# Altium PCB ePBR20_ACU_Power_rev0.PcbDoc (part 3 of 3)
Units mil, origin at the board's own origin, x right, y up, seen from the top; angles counter-clockwise.
Board outline 7475 x 3770 mil, 2 copper layers (Top Layer, Bottom Layer); 143 components, 136 nets, 557 pads, 1444 vias.
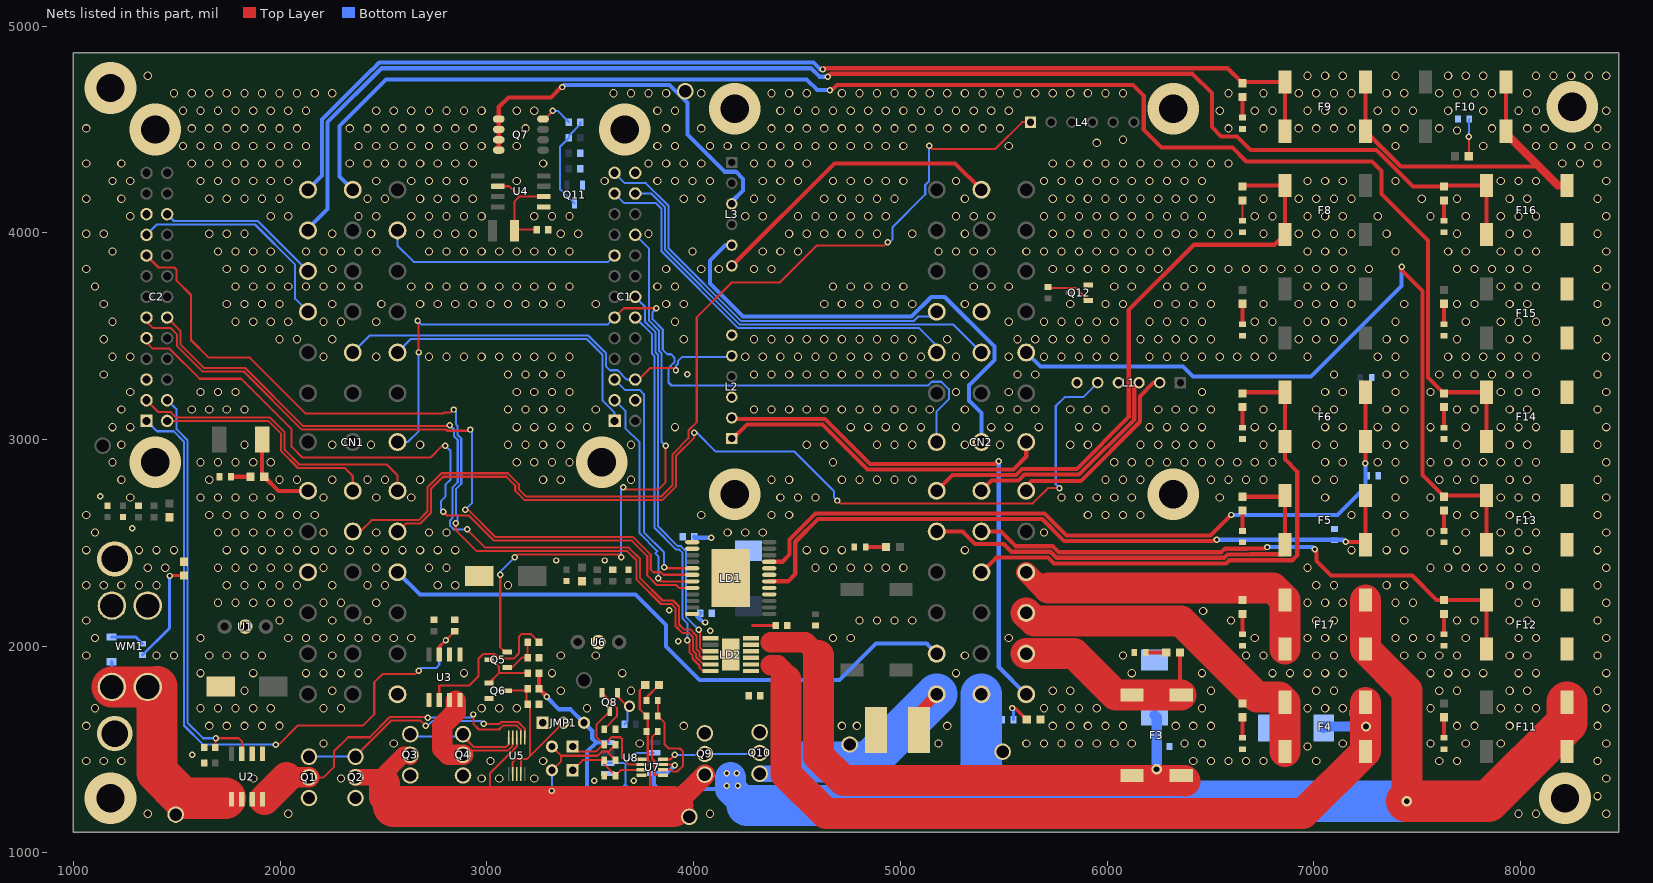
[diagram p2: the nets of this part, all layers, seen from the top]

## Via types
v1: diameter 40, hole 30, Top Layer to Bottom Layer, 1281 vias
v2: diameter 31, hole 17, Top Layer to Bottom Layer, 142 vias
v3: diameter 250, hole 137, Top Layer to Bottom Layer, 12 vias
v4: diameter 50, hole 28, Top Layer to Bottom Layer, 5 vias
v5: diameter 170, hole 128, Top Layer to Bottom Layer, 2 vias
v6: diameter 55, hole 35, Top Layer to Bottom Layer, 1 vias
v7: diameter 100, hole 75, Top Layer to Bottom Layer, 1 vias

## Nets (pads, with @x,y where several pads share a name; then routed paths per layer and width w, separated by ;. In a path a pad name is that pad's centre, name@x,y a point inside that pad or via, vN(x,y) a via of type N, cw(c..) or ccw(c..) an arc to the next point about the centre after c; other vN are vias at no path point) (continued)
DCDC_CURR_SENS: C2.A1 C8.2 U3.7 | length 3395.1
  Top Layer w10: v2@1992.83,1524.01 2084.62,1615.79 2400.72,1615.79 2455.5,1670.58 2455.5,1825.15 2495.35,1865 2653.74,1865 v2(2670,1881.26) ; v2(2802.56,2030) C8.2@2845,2072.44
  Top Layer w15: v2(1980,1524.01) v2@1992.83,1524.01 ; U3.7@2770,1960.24 2770,1997.44 v2(2802.56,2030)
  Bottom Layer w10: C2.A1@1355,3090 1405,3040 1485,3040 1535.5,2989.5 1535.5,1616.5 1627.99,1524.01 v2(1980,1524.01) ; v2(2670,1881.26) 2683.74,1895 2755,1895 2770,1910 2770,1997.44 v2(2802.56,2030)
DCDC_EN: JMP1.2 Q6.3 R4.2 R7.1 U5.2 U5.4 | length 881.8
  Top Layer w10: Q6.3@3099.29,1785 3182.44,1785 3192.44,1795 R4.2@3192.44,1720 ; U5.2@3125.3,1382 3125.3,1439.76 3140.54,1455 3164.7,1455 ; U5.4@3164.7,1382 3164.7,1455 ; R4.2@3197.44,1720 3210,1707.44 3210,1470 ; JMP1.2@3370,1630 3210,1470 ; 3164.7,1455 3195,1455 3210,1470
DCDC_EN_INT: C1.B10 Q5.2 | length 2864.4
  Top Layer w10: v2(3065,2345) 3065,1995 3087.6,1972.4 Q5.2@3099.29,1972.4 ; v2(3135,2430) 3148,2443 3642,2443 v2@3655,2430 ; v2(3660,2770) 3672.29,2757.71 3828.51,2757.71 3865,2794.2 v2(3865,2970)
  Bottom Layer w10: v2(3065,2345) 3065,2360 v2(3135,2430) ; v2(3650,2430) 3650,2760 v2(3660,2770) ; C1.B10@3718.02,3990 3785,3923.02 3785,3574.04 3834,3525.04 3834,3428.12 3845.13,3416.99 3845.13,2989.87 v2(3865,2970)
DCDC_PWR: CN1.39 R6.1 U3.1 U3.2 | length 787.6
  Top Layer w10: U3.2@2770,1739.76 2770,1810 2915,1810 2960,1855 2960,1940 2981.81,1961.81 3039.56,1961.81 3061.37,1940 3130,1940 3155,1965 3155,2045 3170,2060 3212.56,2060 R6.1@3252.56,2020
DCDC_TO_PWR_SW: Q4.2 U3.3 U3.4 U5.9 | length 677.1
  Top Layer w10: Q4.2@2885,1465 2915,1495 3101.25,1495 3125.3,1519.05 U5.9@3125.3,1558
  Top Layer w50: Q4.2@2878.93,1465 Q4.2@2885,1465
  Top Layer w100: 2850,1735 2850,1681.59 2785,1616.59 2785,1505 2815,1475 Q4.2@2885,1475
DELAYED_UV: JMP3.1 Q8.3 R11.2 U7.2 | length 688.7
  Top Layer w10: JMP3.1@3415,1515 3439.53,1490.47 3527.91,1490.47 3561.45,1524.01 R11.2@3567.44,1524.01 ; Q8.3@3595,1685.71 3530,1620.71 3530,1561.45 R11.2@3567.44,1524.01 ; U7.2@3751.14,1430.51 U7.2@3748.43,1427.8 3687.2,1427.8 3655,1460 3655,1551.45 3646.45,1560 3603.43,1560 R11.2@3567.44,1524.01
EMETER_PWR: CN1.4 D20.1 F16.2 | length 6861.8
  Top Layer w20: v2@4649.69,4754.69 v2(4650,4755) 4664,4769 6414.18,4769 6507,4676.18 6507,4511.18 6552.18,4466 6629,4466 6695,4400 7302.8,4400 7479.34,4223.46 D20.1@7630,4223.46 7635.43,4228.9 F16.2@7835.12,4228.9 F16.2@7835.12,3991.1
  Bottom Layer w20: CN1.4@2135,4011.62 2135,4020 2230,4115 2230,4535 2491,4796 4569,4796 4610,4755 v2(4650,4755)
EXTRA_INPUT1: C1.A1 CN1.15 | length 1394.3
  Bottom Layer w10: CN1.15@2568.07,3421.07 2633,3486 3483.92,3486 3558.9,3411.02 3558.9,3189.55 3618.02,3130.44 C1.A1@3618.02,3090
EXTRA_INPUT2: C2.A10 CN1.10 | length 1073.6
  Bottom Layer w10: C2.A10@1354.02,3990 1404.02,4040 1878.66,4040 2072.92,3845.74 2072.92,3680 CN1.10@2135,3617.92
F\A\U\L\T\2\: R16.1 R18.2 U7.6 | length 514.3
  Top Layer w10: R16.1@3827.56,1738 R18.2@3827.56,1663 3827.56,1662.44 3860,1630 3860,1525 3879.5,1505.5 3934.5,1505.5 3950,1490 3950,1421.87 3922.63,1394.5 3897.37,1394.5 3886.95,1404.92 3854.29,1404.92 U7.6@3851.57,1402.2
FANS_CTRL: C1.B7 LD2.3 | length 1927.7
  Top Layer w10: v2(4025,2080) 4031.5,2073.5 4031.5,1992.71 4048.46,1975.75 LD2.3@4082.56,1975.75 4081.81,1975 LD2.3@4049.21,1975
  Bottom Layer w10: C1.B7@3718.02,3690 3765,3643.02 3765,3570 3817,3518 3817,3421.08 3828.13,3409.95 3828.13,3144.39 3828,3144.25 3828,3135.75 3828.13,3135.61 3828.13,2579.95 3923.58,2484.5 3938.43,2484.5 3964.5,2458.43 3964.5,2140.5 v2(4025,2080)
FANS_FB: C2.B6 LD2.4 | length 3820.7
  Top Layer w10: C2.B6@1454.02,3590 1518,3526.02 1518,3460.08 1633.08,3345 1832.88,3345 2112.88,3065 2113.18,3065.31 2815.31,3065.31 v2(2820,3070) ; v2@2905,2564 2992,2477 3687.04,2477 3742,2422.04 3742,2366.97 3741.91,2366.87 3741.91,2329.17 3849.82,2221.26 3900.95,2221.26 3929.88,2192.33 3929.88,2105.12 3953,2082 3983.56,2082 4014.5,2051.06 4014.5,1985.67 4029,1971.17 4029,1955.04 4039.79,1944.25 LD2.4@4082.56,1944.25
  Bottom Layer w10: v2(2820,3070) 2841.5,3048.5 2841.5,3015.79 2859.5,2997.79 2859.5,2792.58 2833.5,2766.58 2833.5,2619.53 2822.5,2608.53 2822.5,2582.5 2840,2565 v2(2905,2565)
FANS_FUSE: D23.2 F3.1 LD2.10 LD2.11 R38.1 | length 2831
  Top Layer w100: 4375,2020 4540,2020 4605,1955
  Top Layer w150: 4605,1955 4605,1470 4724.8,1350.2 5910,1350.2 5910,1350 6375,1350 F3.1@6377.8,1347.2
  Bottom Layer w50: D23.2@6230,1666.14 6240,1656.14 v4(6240,1405)
FANS_PWR: CN2.4 D8.1 F3.2 | length 1039.8
  Top Layer w10: F3.2@6353.46,1770.31 F3.2@6358.9,1764.88
  Top Layer w20: F3.2@6353.46,1770.31 D8.1@6353.46,1970
  Top Layer w150: CN2.4@5609.06,1964.38 5840.62,1964.38 6040.12,1764.88 F3.2@6121.1,1764.88 F3.2@6358.9,1764.88
GATE: Q9.1 Q10.1 U7.8 | length 481.1
  Top Layer w10: U7.8@3851.57,1453.39 3888.39,1453.39 v2(3910,1475) ; Q10.1@4315.05,1478.98 Q10.1@4320,1483.92
  Bottom Layer w10: v2(3910,1475) 4051.02,1475 Q9.1@4055,1478.98 Q10.1@4315.05,1478.98
GND: C1.1 C1.B2 C1.B13 C2.1 C2.A3 C2.A11 C4.1 C5.1 C6.2 C7.1 C8.1 C9.2 C11.1 C13.1 C14.1 C15.1 C16.2 C17.1 C18.1 CN1.28 CN2.29 D1.2 D2.1 D4.2 D7.2 D22.1 D23.1 D24.1 JMP1.1 L1.4 L1.6 L2.3 L2.6 LD1.2 LD2.1 Q6.2 Q11.2 Q12.2 R1.1 R3.2 R4.1 R5.1 R9.1 R12.1 R14.2 R15.1 R19.1 R20.2 R21.2 R22.2 R23.2 R24.2 R25.2 R26.2 R27.2 R28.2 R29.2 R30.2 R31.2 R32.2 R33.2 R34.2 R35.2 R36.2 R37.1 R38.2 R39.2 R42.2 R44.1 R45.1 R48.2 U1.2 U2.5 U2.6 U3.5 U3.6 U4.1 U5.3 U6.2 U7.4 U8.1 WM1.2
  other v1: 1360,1190 2040,1190 4080,1190 7990,1190 8075,1190 8415,1190 8372.5,1275 1870,1360 2295,1360 2975,1360 3060,1360 3230,1360 8415,1360 1062.5,1445 1147.5,1445 1232.5,1445 3017.5,1445 3272.5,1445 6417.5,1445 6502.5,1445 6587.5,1445 6672.5,1445 6757.5,1445 7012.5,1445 7607.5,1445 7692.5,1445 8372.5,1445 6970,1515 2210,1530 2550,1530 3740,1530 5185,1530 5610,1530 5695,1530 5780,1530 5865,1530 5950,1530 6035,1530 6120,1530 6375,1530 6460,1530 7140,1530 7565,1530 7735,1530 7905,1530 8415,1530 1062.5,1615 1657.5,1615 1742.5,1615 1827.5,1615 1912.5,1615 1997.5,1615 3952.5,1615 4717.5,1615 4790,1615 5227.5,1615 5737.5,1615 5822.5,1615 5907.5,1615 5992.5,1615 6077.5,1615 6332.5,1615 6417.5,1615 6502.5,1615 7692.5,1615 7777.5,1615 7947.5,1615 8372.5,1615 1105,1700 1615,1700 1700,1700 1785,1700 1870,1700 1955,1700 2210,1700 2295,1700 2975,1700 3060,1700 3145,1700 3485,1700 5695,1700 5780,1700 5865,1700 5950,1700 6460,1700 6970,1700 7055,1700 7140,1700 7565,1700 7905,1700 7990,1700 8075,1700 8415,1700 1827.5,1785 2252.5,1785 3357.5,1785 3697.5,1785 5737.5,1785 5822.5,1785 6502.5,1785 7012.5,1785 7097.5,1785 7607.5,1785 7692.5,1785 7947.5,1785 8032.5,1785 8372.5,1785 1615,1870 1870,1870 2125,1870 2210,1870 2295,1870 2380,1870 2890,1870 3315,1870 3655,1870 5270,1870 6120,1870 6460,1870 6800,1870 6885,1870 6970,1870 7055,1870 7140,1870 7565,1870 7650,1870 7735,1870 7820,1870 7990,1870 8075,1870 8415,1870 1062.5,1955 1402.5,1955 1487.5,1955 1657.5,1955 1742.5,1955 1827.5,1955 1912.5,1955 2252.5,1955 3357.5,1955 3527.5,1955 5312.5,1955 6077.5,1955 6672.5,1955 6757.5,1955 7012.5,1955 7097.5,1955 7437.5,1955 7522.5,1955 7607.5,1955 7692.5,1955 7947.5,1955 8032.5,1955 8372.5,1955 1105,2040 1615,2040 2040,2040 2125,2040 2210,2040 2295,2040 2380,2040 2465,2040 2550,2040 2635,2040 4675,2040 4760,2040 5525,2040 6715,2040 6970,2040 7055,2040 7140,2040 7395,2040 7480,2040 7565,2040 7735,2040 7990,2040 8075,2040 8415,2040 1062.5,2125 1997.5,2125 2252.5,2125 2422.5,2125 4802.5,2125 4887.5,2125 4972.5,2125 5057.5,2125 6600,2125 7012.5,2125 7097.5,2125 7437.5,2125 7692.5,2125 7777.5,2125 7947.5,2125 8032.5,2125 8372.5,2125 6465,2170 1700,2210 1785,2210 1870,2210 1955,2210 2040,2210 2210,2210 2295,2210 2465,2210 6970,2210 7055,2210 7140,2210 7395,2210 7480,2210 7990,2210 8075,2210 8415,2210 1062.5,2295 1147.5,2295 1232.5,2295 1317.5,2295 1402.5,2295 1742.5,2295 1827.5,2295 1912.5,2295 1997.5,2295 2082.5,2295 2252.5,2295 2422.5,2295 2507.5,2295 2762.5,2295 2847.5,2295 3102.5,2295 7012.5,2295 7097.5,2295 7352.5,2295 7437.5,2295 7947.5,2295 8032.5,2295 8372.5,2295 1360,2380 1445,2380 1700,2380 1785,2380 1870,2380 1955,2380 2040,2380 2210,2380 2465,2380 2720,2380 2805,2380 4590,2380 4675,2380 4760,2380 4845,2380 4930,2380 5015,2380 6970,2380 7565,2380 7650,2380 7735,2380 7820,2380 7905,2380 7990,2380 8075,2380 8415,2380 1062.5,2465 1317.5,2465 1402.5,2465 1487.5,2465 1742.5,2465 1827.5,2465 1912.5,2465 1997.5,2465 2082.5,2465 2167.5,2465 2252.5,2465 2337.5,2465 2422.5,2465 2507.5,2465 2592.5,2465 2677.5,2465 2762.5,2465 2847.5,2465 4547.5,2465 4632.5,2465 4717.5,2465 5312.5,2465 7182.5,2465 7352.5,2465 7437.5,2465 7692.5,2465 7947.5,2465 8032.5,2465 8372.5,2465 1105,2550 1700,2550 1785,2550 1870,2550 1955,2550 2040,2550 2210,2550 2465,2550 2720,2550 2805,2550 4165,2550 4250,2550 4335,2550 5695,2550 7395,2550 7565,2550 7735,2550 7905,2550 7990,2550 8075,2550 8415,2550 1062.5,2635 1657.5,2635 1742.5,2635 1827.5,2635 1912.5,2635 1997.5,2635 2082.5,2635 2167.5,2635 4037.5,2635 4377.5,2635 4462.5,2635 5907.5,2635 5992.5,2635 6077.5,2635 6162.5,2635 7182.5,2635 7352.5,2635 7437.5,2635 7692.5,2635 7777.5,2635 7947.5,2635 8032.5,2635 8372.5,2635 1275,2720 1615,2720 1700,2720 1785,2720 1870,2720 1955,2720 2210,2720 2465,2720 2635,2720 4420,2720 4505,2720 4590,2720 5780,2720 5865,2720 5950,2720 6035,2720 6120,2720 6545,2720 7055,2720 7395,2720 7565,2720 7905,2720 7990,2720 8075,2720 8415,2720 1232.5,2805 1657.5,2805 1997.5,2805 2082.5,2805 2252.5,2805 2422.5,2805 2507.5,2805 2677.5,2805 3272.5,2805 3357.5,2805 3697.5,2805 4377.5,2805 4462.5,2805 4717.5,2805 4802.5,2805 4887.5,2805 4972.5,2805 5057.5,2805 5992.5,2805 6077.5,2805 6162.5,2805 6502.5,2805 6587.5,2805 6672.5,2805 6757.5,2805 7012.5,2805 7097.5,2805 7437.5,2805 7607.5,2805 7692.5,2805 7777.5,2805 7947.5,2805 8032.5,2805 8372.5,2805 1190,2890 1615,2890 1700,2890 1785,2890 1870,2890 1955,2890 3145,2890 3230,2890 3315,2890 3400,2890 4675,2890 6035,2890 6120,2890 6205,2890 6290,2890 6375,2890 6460,2890 6545,2890 6630,2890 6715,2890 6800,2890 7055,2890 7140,2890 7310,2890 7395,2890 7565,2890 7650,2890 7735,2890 7820,2890 7905,2890 7990,2890 8075,2890 8415,2890 1232.5,2975 1827.5,2975 2252.5,2975 2440,2975 2677.5,2975 3102.5,2975 3187.5,2975 3272.5,2975 3357.5,2975 3697.5,2975 4547.5,2975 4632.5,2975 4887.5,2975 4972.5,2975 5057.5,2975 5312.5,2975 5482.5,2975 5822.5,2975 5907.5,2975 6162.5,2975 6247.5,2975 6332.5,2975 6417.5,2975 6502.5,2975 6757.5,2975 7012.5,2975 7097.5,2975 7352.5,2975 7437.5,2975 7692.5,2975 7947.5,2975 8032.5,2975 8372.5,2975 1190,3060 1275,3060 3145,3060 3230,3060 3315,3060 3400,3060 3485,3060 3910,3060 4760,3060 4845,3060 4930,3060 5015,3060 5100,3060 5270,3060 5440,3060 5525,3060 5670,3060 5865,3060 5950,3060 6205,3060 6290,3060 6375,3060 6460,3060 6715,3060 6800,3060 7055,3060 7140,3060 7310,3060 7395,3060 7565,3060 7735,3060 7905,3060 7990,3060 8075,3060 8415,3060 1232.5,3145 1572.5,3145 1657.5,3145 1742.5,3145 1827.5,3145 3102.5,3145 3187.5,3145 3272.5,3145 3357.5,3145 3527.5,3145 4292.5,3145 4377.5,3145 4462.5,3145 4547.5,3145 4632.5,3145 4717.5,3145 4802.5,3145 4887.5,3145 4972.5,3145 5057.5,3145 5142.5,3145 5312.5,3145 5482.5,3145 5567.5,3145 5652.5,3145 5822.5,3145 5907.5,3145 5992.5,3145 6247.5,3145 6332.5,3145 6417.5,3145 6502.5,3145 6757.5,3145 7012.5,3145 7097.5,3145 7352.5,3145 7437.5,3145 7692.5,3145 7777.5,3145 7947.5,3145 8032.5,3145 8372.5,3145 1275,3230 1615,3230 1700,3230 1785,3230 3145,3230 3230,3230 3315,3230 3400,3230 5270,3230 5525,3230 6460,3230 7055,3230 7140,3230 7395,3230 7565,3230 7905,3230 7990,3230 8075,3230 8415,3230 1147.5,3315 3102.5,3315 3187.5,3315 3272.5,3315 3357.5,3315 4292.5,3315 4377.5,3315 4462.5,3315 4547.5,3315 4632.5,3315 4717.5,3315 4802.5,3315 4887.5,3315 4972.5,3315 5057.5,3315 5142.5,3315 5227.5,3315 5312.5,3315 5567.5,3315 5652.5,3315 7097.5,3315 7352.5,3315 7437.5,3315 7607.5,3315 7692.5,3315 7777.5,3315 7862.5,3315 7947.5,3315 8032.5,3315 8372.5,3315 1190,3400 1275,3400 2210,3400 2465,3400 2720,3400 2805,3400 2890,3400 2975,3400 3060,3400 3145,3400 3230,3400 3315,3400 3400,3400 4250,3400 4335,3400 4420,3400 4505,3400 4590,3400 4675,3400 4760,3400 4845,3400 4930,3400 5015,3400 5100,3400 5270,3400 5525,3400 5695,3400 5780,3400 5865,3400 5950,3400 6035,3400 6205,3400 6290,3400 6375,3400 6460,3400 6545,3400 6630,3400 6715,3400 6800,3400 6970,3400 7310,3400 7395,3400 7650,3400 7735,3400 7820,3400 7905,3400 7990,3400 8075,3400 8415,3400 1147.5,3485 1997.5,3485 2082.5,3485 2252.5,3485 3952.5,3485 4292.5,3485 4377.5,3485 4462.5,3485 4547.5,3485 4632.5,3485 4717.5,3485 4802.5,3485 4887.5,3485 4972.5,3485 5057.5,3485 5227.5,3485 5567.5,3485 5652.5,3485 5737.5,3485 5822.5,3485 5907.5,3485 5992.5,3485 6162.5,3485 6247.5,3485 6332.5,3485 6417.5,3485 6502.5,3485 6757.5,3485 6927.5,3485 7012.5,3485 7097.5,3485 7352.5,3485 7437.5,3485 7692.5,3485 7947.5,3485 8032.5,3485 8372.5,3485 1190,3570 1785,3570 1870,3570 1955,3570 2040,3570 2210,3570 2295,3570 2465,3570 3910,3570 5525,3570 5695,3570 5780,3570 5865,3570 5950,3570 6035,3570 6205,3570 6290,3570 6375,3570 6460,3570 6715,3570 6800,3570 6970,3570 7055,3570 7140,3570 7395,3570 7735,3570 7905,3570 7990,3570 8075,3570 8415,3570 1147.5,3655 1742.5,3655 1827.5,3655 1912.5,3655 1997.5,3655 2252.5,3655 2490,3655 2677.5,3655 2762.5,3655 2847.5,3655 2932.5,3655 3017.5,3655 3102.5,3655 3187.5,3655 3272.5,3655 3357.5,3655 3527.5,3655 3867.5,3655 3952.5,3655 4632.5,3655 4717.5,3655 4802.5,3655 4887.5,3655 4972.5,3655 5057.5,3655 5312.5,3655 5822.5,3655 5992.5,3655 6077.5,3655 6247.5,3655 6332.5,3655 6417.5,3655 6502.5,3655 6757.5,3655 6927.5,3655 7012.5,3655 7097.5,3655 7182.5,3655 7437.5,3655 7692.5,3655 7777.5,3655 7947.5,3655 8032.5,3655 8372.5,3655 1105,3740 1785,3740 1870,3740 1955,3740 2040,3740 2125,3740 2210,3740 2295,3740 2380,3740 2635,3740 2720,3740 2805,3740 2890,3740 2975,3740 3060,3740 3145,3740 3230,3740 3315,3740 3400,3740 3825,3740 3910,3740 4675,3740 4760,3740 4845,3740 4930,3740 5015,3740 5355,3740 5440,3740 5525,3740 6035,3740 6120,3740 6290,3740 6375,3740 6460,3740 6970,3740 7055,3740 7140,3740 7905,3740 7990,3740 8075,3740 8415,3740 1062.5,3825 1742.5,3825 1827.5,3825 1912.5,3825 1997.5,3825 2252.5,3825 3867.5,3825 4037.5,3825 4122.5,3825 4292.5,3825 4377.5,3825 5737.5,3825 5822.5,3825 5907.5,3825 5992.5,3825 6077.5,3825 6162.5,3825 6247.5,3825 6417.5,3825 6502.5,3825 6587.5,3825 6672.5,3825 6757.5,3825 6842.5,3825 6927.5,3825 7012.5,3825 7097.5,3825 7182.5,3825 7267.5,3825 7692.5,3825 7777.5,3825 7862.5,3825 7947.5,3825 8032.5,3825 8372.5,3825 1190,3910 1700,3910 1785,3910 1870,3910 1955,3910 2125,3910 2210,3910 2295,3910 2380,3910 2465,3910 2720,3910 2805,3910 2890,3910 2975,3910 3060,3910 3145,3910 3230,3910 3315,3910 3400,3910 3995,3910 4335,3910 4420,3910 4505,3910 5185,3910 5270,3910 5355,3910 5440,3910 5610,3910 5695,3910 5780,3910 5865,3910 5950,3910 6035,3910 6120,3910 6205,3910 6290,3910 6970,3910 7055,3910 7140,3910 7395,3910 7650,3910 7735,3910 7905,3910 7990,3910 8075,3910 8415,3910 1062.5,3995 1147.5,3995 1657.5,3995 1742.5,3995 1827.5,3995 2252.5,3995 2440.5,3995 2677.5,3995 2762.5,3995 2847.5,3995 2932.5,3995 3357.5,3995 3442.5,3995 3782.5,3995 4462.5,3995 4547.5,3995 4632.5,3995 4717.5,3995 4802.5,3995 4887.5,3995 5057.5,3995 5312.5,3995 5737.5,3995 5822.5,3995 5907.5,3995 5992.5,3995 6077.5,3995 6162.5,3995 6247.5,3995 6332.5,3995 6417.5,3995 6502.5,3995 6587.5,3995 6757.5,3995 6927.5,3995 7012.5,3995 7097.5,3995 7182.5,3995 7352.5,3995 7692.5,3995 7947.5,3995 8032.5,3995 8372.5,3995 1275,4080 1955,4080 2040,4080 2380,4080 2465,4080 2635,4080 2720,4080 2805,4080 2890,4080 2975,4080 3230,4080 3315,4080 3400,4080 4250,4080 4335,4080 4505,4080 4590,4080 4675,4080 4760,4080 4845,4080 4930,4080 5270,4080 5355,4080 5440,4080 5695,4080 5780,4080 5865,4080 5950,4080 6035,4080 6120,4080 6205,4080 6290,4080 6375,4080 6460,4080 6715,4080 6800,4080 6970,4080 7055,4080 7140,4080 7310,4080 7565,4080 7735,4080 7905,4080 7990,4080 8075,4080 8415,4080 1062.5,4165 1232.5,4165 1657.5,4165 1742.5,4165 1827.5,4165 1912.5,4165 1997.5,4165 2422.5,4165 2507.5,4165 2677.5,4165 2762.5,4165 2847.5,4165 2932.5,4165 3952.5,4165 4037.5,4165 4292.5,4165 4377.5,4165 4632.5,4165 4717.5,4165 4802.5,4165 4887.5,4165 4972.5,4165 5312.5,4165 5737.5,4165 5822.5,4165 5907.5,4165 5992.5,4165 6077.5,4165 6162.5,4165 6247.5,4165 6332.5,4165 6417.5,4165 6502.5,4165 6757.5,4165 6927.5,4165 7012.5,4165 7097.5,4165 7182.5,4165 7522.5,4165 7692.5,4165 7947.5,4165 8032.5,4165 8372.5,4165 1190,4250 1275,4250 1615,4250 1700,4250 1785,4250 1870,4250 1955,4250 2040,4250 2465,4250 2635,4250 2720,4250 2805,4250 2890,4250 3145,4250 3570,4250 3825,4250 3910,4250 3995,4250 4080,4250 4335,4250 4420,4250 4505,4250 4675,4250 4760,4250 4845,4250 4930,4250 5015,4250 5270,4250 5695,4250 5780,4250 5865,4250 5950,4250 6035,4250 6120,4250 6205,4250 6290,4250 6375,4250 6460,4250 6970,4250 7055,4250 7140,4250 7395,4250 7905,4250 7990,4250 8075,4250 8415,4250 1062.5,4335 1232.5,4335 1572.5,4335 1657.5,4335 1742.5,4335 1827.5,4335 1912.5,4335 1997.5,4335 2082.5,4335 2337.5,4335 2422.5,4335 2507.5,4335 2592.5,4335 2677.5,4335 2762.5,4335 2847.5,4335 2932.5,4335 3272.5,4335 3782.5,4335 3867.5,4335 3952.5,4335 4037.5,4335 4292.5,4335 4377.5,4335 4462.5,4335 4547.5,4335 5737.5,4335 5822.5,4335 5907.5,4335 5992.5,4335 6077.5,4335 6162.5,4335 6247.5,4335 6332.5,4335 6417.5,4335 6502.5,4335 6587.5,4335 8202.5,4335 8287.5,4335 8372.5,4335 1530,4420 1615,4420 1700,4420 1785,4420 1870,4420 1955,4420 2040,4420 2125,4420 2380,4420 2465,4420 2550,4420 2635,4420 2720,4420 2805,4420 2890,4420 2975,4420 3145,4420 3825,4420 3910,4420 4080,4420 4165,4420 4250,4420 4335,4420 4420,4420 4505,4420 4590,4420 4675,4420 4760,4420 4845,4420 4930,4420 5015,4420 5525,4420 7395,4420 7820,4420 8075,4420 8160,4420 8245,4420 8330,4420 8415,4420 5950,4435 6077.5,4450 7692.5,4495 1062.5,4505 1572.5,4505 1657.5,4505 1742.5,4505 1827.5,4505 1912.5,4505 1997.5,4505 2082.5,4505 2337.5,4505 2422.5,4505 2507.5,4505 2592.5,4505 2677.5,4505 2762.5,4505 2847.5,4505 2932.5,4505 3187.5,4505 3867.5,4505 4037.5,4505 4377.5,4505 4462.5,4505 4547.5,4505 4632.5,4505 4717.5,4505 4802.5,4505 4887.5,4505 4972.5,4505 5057.5,4505 5142.5,4505 5227.5,4505 5312.5,4505 5397.5,4505 5482.5,4505 6587.5,4505 6757.5,4505 6927.5,4505 7012.5,4505 7097.5,4505 7182.5,4505 7352.5,4505 7437.5,4505 7607.5,4505 7862.5,4505 8032.5,4505 8117.5,4505 8372.5,4505 1530,4590 1615,4590 1700,4590 1785,4590 1870,4590 1955,4590 2040,4590 2125,4590 2465,4590 2550,4590 2635,4590 2720,4590 2805,4590 2890,4590 2975,4590 3145,4590 3230,4590 3825,4590 3910,4590 4420,4590 4505,4590 4590,4590 4675,4590 4760,4590 4845,4590 4930,4590 5015,4590 5100,4590 5185,4590 5270,4590 5355,4590 5440,4590 5525,4590 6545,4590 6715,4590 6800,4590 6970,4590 7055,4590 7140,4590 7310,4590 7395,4590 7480,4590 7650,4590 7820,4590 7990,4590 8075,4590 8415,4590 1487.5,4675 1572.5,4675 1657.5,4675 1742.5,4675 1827.5,4675 1912.5,4675 1997.5,4675 2082.5,4675 2167.5,4675 2252.5,4675 3612.5,4675 3697.5,4675 3782.5,4675 3867.5,4675 4037.5,4675 4377.5,4675 4462.5,4675 4547.5,4675 4717.5,4675 4802.5,4675 4887.5,4675 4972.5,4675 5057.5,4675 5142.5,4675 5227.5,4675 5312.5,4675 5397.5,4675 5482.5,4675 5567.5,4675 5652.5,4675 5737.5,4675 5822.5,4675 5907.5,4675 5992.5,4675 6077.5,4675 6587.5,4675 6757.5,4675 6927.5,4675 7012.5,4675 7097.5,4675 7182.5,4675 7352.5,4675 7437.5,4675 7607.5,4675 7692.5,4675 7777.5,4675 7862.5,4675 8032.5,4675 1360,4760 6970,4760 7055,4760 7140,4760 7395,4760 7650,4760 7735,4760 7820,4760 8075,4760 8160,4760 8245,4760 8330,4760 8415,4760
  other v2: 3520,1350 3710,1350 1575,1475 3927,2025 4080,2075 3882,2175 3335,2415 3570.87,2415 1285,2570 1130,2725 3970,3315
  other v3: 1180,1265 8215,1265 4200,2735 6320,2735 1396,2890 3556,2890 1396,4500 3668,4500 4200,4600 6320,4600 8250,4610 1180,4700
  other v5: 1200.55,1577.56 1200.55,2422.44
GREEN_LED_GND: CN2.17 L1.3 | length 1070
  Top Layer w20: CN2.17@5392.52,2751.78 5441.74,2801 5571,2801 5600,2830 5865,2830 6132,3097 6132,3252 L1.3@6155,3275
HCP_H_CURR_SENS: C2.B1 CN1.23 | length 1129.4
  Top Layer w10: C2.B1@1454.02,3090 1943.63,3090 2005,3028.63 2005,2943.62 2086.62,2862 2313,2862 2351.54,2823.46 CN1.23@2351.54,2751.78
HCP_L_CURR_SENS: C2.A2 CN1.24 | length 1489.4
  Top Layer w10: C2.A2@1354.02,3190 1411.9,3132.12 1471.46,3132.12 1496.58,3107 1950.67,3107 2022,3035.67 2022,2950.66 2093.66,2879 2516,2879 2568.07,2826.93 CN1.24@2568.07,2751.78
HCP_SENS_PWR: CN1.22 D3.1 F1.2 | length 424.1
  Top Layer w20: F1.2@1912.95,3000 1912.95,2830.51 D3.1@1923.46,2820 1991.69,2751.78 CN1.22@2135,2751.78
HVB_PWR: CN1.2 D18.1 F14.2 | length 7415
  Top Layer w20: v2(4660,4690) 4665.5,4695.5 4674.65,4695.5 4694.15,4715 6125,4715 6178,4662 6178,4497 6263,4412 6606.63,4412 6673.63,4345 7281.43,4345 7327.43,4299 7327.43,4187.57 7553,3962 7553,3300.46 D18.1@7630,3223.46 7635.43,3228.9 F14.2@7835.12,3228.9 F14.2@7835.12,2991.1
  Bottom Layer w20: CN1.2@2351.54,4208.47 2287,4273.01 2287,4515.63 2513.37,4742 4546.63,4742 4598.63,4690 v2(4660,4690)
IMD_LED: CN2.38 L3.6 | length 1465.8
  Top Layer w20: L3.6@4185,3840 4681,4336 5264.99,4336 CN2.38@5392.52,4208.47
IMD_OK: C1.B3 CN1.14 L2.5 | length 2084.7
  Top Layer w10: C1.B3@3718.02,3290 3723.02,3285 3736.02,3298 3739.02,3295 3789.26,3345.24 3904.76,3345.24 v2(3915,3335)
  Bottom Layer w10: CN1.14@2351.54,3421.07 2433.46,3503 3490.96,3503 3565.96,3428 3567,3428 3575.9,3419.1 3575.9,3354.1 3595,3335 3632.58,3335 3677.58,3290 C1.B3@3718.02,3290 ; v2@3915,3325.23 v2(3915,3335) 3915,3357.07 3924.5,3366.57 3924.5,3379.5 3945,3400 L2.5@4185,3400
IMD_PWR: CN1.1 D14.1 F9.2 | length 5425
  Top Layer w20: v2(4625,4790) 4631,4796 6582.46,4796 D14.1@6655,4723.46 6660.43,4728.9 F9.2@6860.12,4728.9 F9.2@6860.12,4491.1
  Bottom Layer w20: CN1.1@2135,4208.47 2203,4276.47 2203,4548 2445,4790 2446.82,4790 2479.82,4823 4580.18,4823 4613.18,4790 v2(4625,4790)
IMD_RESIST: C2.B11 CN1.7 | length 795
  Bottom Layer w10: C2.B11@1454.02,4090 1487.02,4057 1892.77,4057 CN1.7@2135,3814.77
LATCH_RST: CN2.1 L2.2 | length 2569.5
  Top Layer w20: L2.2@4185,3100 4635,3100 4853,2882 5458.44,2882 5471.44,2895 v2(5476.44,2895)
  Bottom Layer w20: v2(5476.44,2895) 5476.44,1900.14 CN2.1@5609.06,1767.53
LATCHING_Delayed: L3.3 pad.9@3960,4685 Q7.5 Q7.6 Q7.7 Q7.8 | length 1872.1
  Top Layer w20: Q7.8@3041.82,4400 Q7.8@3057.72,4400 Q7.7@3057.72,4450 Q7.6@3057.72,4500 Q7.5@3057.72,4550 3057.72,4607.72 3105,4655 3310,4655 3360,4705 v2(3365,4705)
  Bottom Layer w20: v2(3365,4705) 3365,4706.53 3373.47,4715 3883.96,4715 3970,4628.96 3970,4475.92 4150.44,4295.48 4204.52,4295.48 4240,4260 4240,4205 4185,4150 L3.3@4185,4140
LVBATT_CURR_SENS: C2.B2 C5.2 U2.7 | length 2005.6
  Top Layer w10: C5.2@1687.56,1510 v2@1687.56,1552.56 ; v2(1690,1555) 1800,1555 1815,1540 U2.7@1815,1480.24
  Top Layer w15: v2@1687.56,1552.56 v2(1690,1555)
  Bottom Layer w10: C2.B2@1455,3190 1500,3145 1500,3049.04 1552.5,2996.54 1552.5,1630.61 1628.11,1555 v2(1690,1555)
MC_EN: CN2.11 D11.1 F6.2 | length 2631.1
  Top Layer w20: CN2.11@5392.52,2382.52 CN2.11@5392.52,2358.08 5464.44,2430 5715,2430 5744,2401 6576.51,2401 6591.51,2416 6896.26,2416 6920,2439.74 6920,2845 6860.12,2904.88 F6.2@6860.12,2991.1 F6.2@6860.12,3228.9 6660.43,3228.9 D11.1@6655,3223.46
MC_EN_CTRL: C1.A3 LD1.5 | length 1188.4
  Top Layer w10: v2(3857.5,2381.24) 3861.5,2377.24 LD1.5@3993.98,2377.24
  Bottom Layer w10: C1.A3@3618.02,3290 3668,3240.02 3739.98,3240.02 3760.13,3219.87 3760.13,3172.55 3760,3172.42 3760,3107.58 3760.13,3107.45 3760.13,2550.82 3857.5,2453.46 v2(3857.5,2381.24)
MC_EN_FB: C2.A6 LD1.6 | length 3525.1
  Top Layer w10: C2.A6@1354.02,3590 1354.02,3570.98 1385,3540 1470,3540 1501,3509 1501,3453.04 1626.04,3328 1825.83,3328 2105.83,3048 2119.92,3048 2120.22,3048.31 2802.8,3048.31 2808.61,3042.5 2914.19,3042.5 v2(2920,3048.31) ; v2(2895,2660) 2910.08,2660 3042.08,2528 3708.17,2528 3793,2443.17 3793,2370.65 3805.58,2358.08 3841.77,2358.08 3854.1,2345.75 LD1.6@3993.98,2345.75
  Bottom Layer w10: v2(2895,2660) 2927.5,2692.5 2927.5,3040.81 v2(2920,3048.31) v2@2920,3039
MC_EN_FUSE: F6.1 LD1.19 LD1.20 LD1.21 R35.1 | length 3623
  Top Layer w20: LD1.21@4366.02,2408.74 4429.72,2408.74 4464.49,2443.51 4464.49,2516.31 4590.42,2642.24 5697.95,2642.24 5804.18,2536 6501,2536 v2(6600,2635) ; F6.1@7249.88,2991.1 F6.1@7249.88,3228.9 ; v2(7250,2885) F6.1@7250,2990.98
  Bottom Layer w20: v2(6600,2635) 7115,2635 7250,2770 v2(7250,2885)
MC_PWR: CN2.15 D10.1 F5.2 | length 2229
  Top Layer w20: CN2.15@5175.98,2554.93 5301.99,2554.93 5362.3,2494.62 5500.38,2494.62 5538,2457 5726.18,2457 5755.18,2428 6565.33,2428 6581.99,2444.66 6690.94,2444.66 6691.28,2445 6849.76,2445 6860.12,2455.35 F5.2@6860.12,2491.1 F5.2@6860.12,2728.9 6854.69,2723.46 D10.1@6655,2723.46
MC_PWR_CTRL: C1.A2 LD1.7 | length 1127.3
  Top Layer w10: v2(3830,2328.05) 3843.8,2314.25 LD1.7@3993.98,2314.25
  Bottom Layer w10: C1.A2@3619,3190 3670,3139 3670,3055 3739,2986 3739,2546 3825,2460 3815,2450 3830,2435 v2(3830,2328.05)
MC_PWR_FB: C2.A5 LD1.8 | length 3552
  Top Layer w10: C2.A5@1360,3490 C2.A5@1354.02,3490 1354.02,3470.98 1385,3440 1465,3440 1611,3294 1811.75,3294 2056,3049.75 2056,2964.74 2107.74,2913 2728,2913 2785,2970 v2(2800,2970) ; v2(2790,2650) 2807.5,2632.5 2913.54,2632.5 3035.04,2511 3701.12,2511 3776,2436.12 3776,2352.88 3775.91,2352.79 3775.91,2343.25 3822.67,2296.49 3916.14,2296.49 3929.88,2282.76 LD1.8@3993.98,2282.76
  Bottom Layer w10: v2(2800,2970) 2825.5,2944.5 2825.5,2806.67 2799.5,2780.67 2799.5,2723.39 2777.5,2701.39 2777.5,2662.5 v2(2790,2650) v2@2800.24,2650
MC_PWR_FUSE: F5.1 LD1.16 LD1.17 LD1.18 R39.1 | length 3374.9
  Top Layer w20: LD1.18@4366.02,2314.25 4456.17,2314.25 4492,2350.08 4492,2505.63 4601.6,2615.24 5686.76,2615.24 5793,2509 6512.18,2509 6519.09,2515.91 6529.09,2515.91 v2(6530,2515) ; v2(7155,2505) 7249.88,2505 F5.1@7249.88,2728.9
  Bottom Layer w20: v2(6530,2515) 7145,2515 v2(7155,2505)
NetC10_2: C10.2 R9.2 U4.2 U4.6 | length 529.7
  Top Layer w10: U4.6@3053.78,4225 3107.76,4225 3157.76,4175 ; R9.2@3242.44,4015 3138.15,4015 C10.2@3133.15,4010 3133.15,4150.39 3157.76,4175 ; U4.2@3276.22,4175 3157.76,4175
NetD2_2: D2.2 R47.1 | length 505.2
  Top Layer w15: v2(1466.81,2340) 1468.35,2341.53 D2.2@1535,2341.53
  Bottom Layer w15: R47.1@1335,1957.44 1465,2087.44 v2@1465,2340
NetD3_2: D3.2 R3.1 | length 96.4
  Top Layer w20: R3.1@1765,2820 R3.1@1762.56,2820 D3.2@1856.53,2820
NetD5_2: D5.2 R16.2 | length 100.3
  Top Layer w10: R16.2@3772.44,1738 3772.44,1751.98 D5.2@3833.47,1813
NetD6_2: D6.2 R20.1 | length 99
  Top Layer w20: R20.1@4832.56,2480 D6.2@4931.53,2480
NetD7_1: D7.1 R40.2 | length 139.3
  Top Layer w15: v2(5541.75,1701.3) 5544.81,1698.24 5558.3,1698.24 D7.1@5611.54,1645
  Bottom Layer w15: R40.2@5547.56,1645 v2@5547.56,1691.16
NetD8_2: D8.2 R21.1 | length 99
  Top Layer w20: R21.1@6187.56,1970 D8.2@6286.53,1970
NetD9_2: D9.2 R22.1 | length 99
  Top Layer w20: R22.1@6655,1557.56 D9.2@6655,1656.53
NetD10_2: D10.2 R23.1 | length 99
  Top Layer w20: R23.1@6655,2557.56 D10.2@6655,2656.53
NetD11_2: D11.2 R24.1 | length 99
  Top Layer w20: R24.1@6655,3057.56 D11.2@6655,3156.53
NetD12_2: D12.2 R25.1 | length 99
  Top Layer w20: R25.1@6655,3557.56 D12.2@6655,3656.53
NetD13_2: D13.2 R26.1 | length 99
  Top Layer w10: R26.1@6655,4057.56 D13.2@6655,4156.53
NetD14_2: D14.2 R27.1 | length 99
  Top Layer w20: R27.1@6655,4557.56 D14.2@6655,4656.53
NetD15_2: D15.2 R28.1 | length 99
  Top Layer w20: R28.1@7630,1557.56 D15.2@7630,1656.53
NetD16_2: D16.2 R29.1 | length 99
  Top Layer w20: R29.1@7630,2057.56 D16.2@7630,2156.53
NetD17_2: D17.2 R30.1 | length 99
  Top Layer w20: R30.1@7630,2557.56 D17.2@7630,2656.53
NetD18_2: D18.2 R31.1 | length 99
  Top Layer w20: R31.1@7630,3057.56 D18.2@7630,3156.53
NetD19_2: D19.2 R32.1 | length 99
  Top Layer w20: R32.1@7630,3557.56 D19.2@7630,3656.53
NetD20_2: D20.2 R33.1 | length 99
  Top Layer w20: R33.1@7630,4057.56 D20.2@7630,4156.53
NetD21_2: D21.2 R34.1 | length 181.1
  Top Layer w10: D21.2@7750,4370 v2(7750,4465)
  Bottom Layer w10: v2(7750,4465) 7750,4547.44 R34.1@7752.56,4550
NetD25_A: D25.A R47.2 | length 163.4
  Bottom Layer w15: D25.A@1185,2045 1302.56,2045 R47.2@1335,2012.56
NetD26_2: D26.2 R48.1 | length 99
  Top Layer w20: R48.1@6655,2057.56 D26.2@6655,2156.53
NetQ1_1: Q1.1 Q2.1 U5.6 | length 1223.8
  Top Layer w10: Q2.1@2365,1465.95 2365,1467.24 2538.98,1641.22 2678.78,1641.22 v2(2705,1615) v2@2710,1610 ; v2(2985,1625) 3062.25,1625 3070.68,1633.43 3152.27,1633.43 3183.94,1601.75 U5.6@3183.94,1558
  Bottom Layer w10: Q1.1@2140,1465.95 Q2.1@2365,1465.95 ; v2(2705,1615) 2705,1606.11 2736.89,1638 2972,1638 v2(2985,1625) v2@2984.5,1624.5
NetQ1_3: Q1.3 Q2.3 | length 0
NetQ3_1: Q3.1 Q4.1 U5.10 | length 535.5
  Top Layer w10: Q4.1@2885,1565 2938,1512 3091.1,1512 3105.6,1526.5 U5.10@3105.6,1558
  Bottom Layer w10: Q3.1@2630,1565 2630.5,1564.5 2884.5,1564.5 Q4.1@2885,1565
NetQ3_3: Q3.3 Q4.3
NetQ5_1: Q5.1 R5.2 R6.2 | length 192.8
  Top Layer w10: Q5.1@3099.29,1897.6 3122.6,1897.6 3170,1945 R5.2@3197.44,1945 R6.2@3197.44,2020
NetQ5_3: Q5.3 Q6.1 R8.1 | length 299.5
  Top Layer w10: Q6.1@3010.71,1822.4 3058.31,1870 ; Q5.3@3010.71,1935 3025,1935 3058.31,1901.69 3058.31,1870 ; R8.1@3197.44,1870 3058.31,1870
NetQ7_4: Q7.4 R46.2 | length 164.5
  Top Layer w10: Q7.4@3272.28,4550 3280,4550 v2(3320,4590)
  Bottom Layer w10: v2(3320,4590) 3342.44,4590 R46.2@3397.44,4535
NetQ8_2: Q8.2 R14.1 | length 230.7
  Top Layer w10: Q8.2@3557.6,1774.29 3567.44,1764.45 3611.54,1720.35 3611.78,1720.35 3618.81,1713.32 3618.81,1713.08 3629.29,1702.6 3629.29,1660.86 R14.1@3567.44,1599.01
NetQ11_3: Q11.3 R43.1 R46.1 | length 463.8
  Bottom Layer w10: Q11.3@3425,4140.71 3424.76,4140.71 3355,4210.47 3355,4417.56 R43.1@3397.44,4460 3397.44,4468.98 3452.56,4524.09 R46.1@3452.56,4535
NetQ12_1: Q12.1 R49.2 | length 227.7
  Top Layer w10: R49.2@5715,3737.56 5718.75,3733.81 5848.32,3733.81 5891.65,3690.47 5891.65,3679.41 5898.46,3672.6 Q12.1@5909.29,3672.6
NRST: C1.B12 CN2.26 | length 2113.2
  Bottom Layer w10: C1.B12@3718.02,4190 3795,4190 3862.13,4122.87 3862.13,3917.71 4223.85,3556 5257.59,3556 CN2.26@5392.52,3421.07
OV: JMP2.1 R12.2 R13.1 U7.3 | length 408.1
  Top Layer w10: JMP2.1@3415,1400 3464.01,1449.01 R13.1@3567.44,1449.01 3567.44,1429.13 R12.2@3622.56,1374.01 3650.75,1402.2 U7.3@3748.43,1402.2
PRECHRG_CTRL: C1.A9 CN1.6 | length 1169.8
  Bottom Layer w10: CN1.6@2568.07,4011.62 2568.07,3936.93 2646,3859 3587.02,3859 C1.A9@3618.02,3890
PUMP_CTRL: C1.B6 LD2.6 | length 1898.2
  Top Layer w10: v2(3970,2030) 3980,2020 3980,1971.71 3995,1956.71 3995,1940.96 4029,1906.96 4029,1896 4043.74,1881.26 LD2.6@4082.56,1881.26
  Bottom Layer w10: C1.B6@3719,3590 3800,3509 3800,3414.04 3811.13,3402.91 3811.13,3151.43 3811,3151.3 3811,3128.7 3811.13,3128.57 3811.13,2572.91 3916.54,2467.5 3931.39,2467.5 3947.5,2451.39 3947.5,2133.46 3970,2110.96 v2(3970,2030) 3970,2029.76 v2@3965,2024.76
PUMP_FB: C2.A9 LD2.5 | length 4239.3
  Top Layer w10: C2.A9@1354.02,3890 1411.9,3832.12 1487.86,3832.12 1500,3819.97 1500,3768.06 1569,3699.06 1569,3481.21 1654.21,3396 1854,3396 2125,3125 2788.03,3125 2794.53,3131.5 2826.5,3131.5 v2(2840,3145) ; v2(2850,2595) 2850,2562 2952,2460 3680,2460 3725,2415 3725,2374.01 3724.91,2373.91 3724.91,2322.13 3842.78,2204.26 3893.91,2204.26 3912.5,2185.66 3912.5,2172.24 3912.88,2171.86 3912.88,2098.08 3945.96,2065 3976.52,2065 3997.5,2044.02 3997.5,1978.25 4012,1963.75 4012,1948 4047.24,1912.76 LD2.5@4082.56,1912.76
  Bottom Layer w10: v2(2840,3145) 2850.5,3134.5 2850.5,3074.5 2858.5,3066.5 2858.5,3022.83 2876.5,3004.83 2876.5,2785.54 2850.5,2759.54 2850.5,2641.57 2858,2634.07 2858,2603 v2(2850,2595)
PUMP_FUSE: D22.2 F4.1 LD2.8 LD2.9 R37.2 | length 4014.5
  Top Layer w100: 4373.22,1908 4407,1908 4460,1855
  Top Layer w150: 4448,1837 4448,1382 4639.8,1190.2 4766.1,1190.2 6948.98,1190.2 F4.1@7249.88,1491.1 F4.1@7249.88,1728.9
  Bottom Layer w50: D22.2@7048.86,1605 7055.86,1612 v4(7252.94,1612)
PUMP_PWR: CN2.7 D9.1 F4.2 | length 1667.9
  Top Layer w150: CN2.7@5609.06,2161.23 5648.91,2121.38 6358.62,2121.38 6705.77,1774.23 6725,1755 6834.02,1755 F4.2@6860.12,1728.9 F4.2@6860.12,1491.1
RED_LED_GND: CN2.16 L1.2 | length 947.9
  Top Layer w20: CN2.16@5609.06,2751.78 5609.06,2774.06 5635,2800 5873.18,2800 6159,3085.82 6159,3209 6225,3275 L1.2@6255,3275
SCHT_FROM_AUX_TO_ACC: CN1.30 CN2.6 | length 2977.6
  Bottom Layer w20: CN1.30@2568.07,2358.08 2676.15,2250 3720.11,2250 3867,2103.11 3867,1998.73 4028.73,1837 4706.89,1837 4882.45,2012.56 5127.8,2012.56 CN2.6@5175.98,1964.38
SCHT_OUT_LATCH: CN2.19 L2.1 | length 1641.6
  Top Layer w20: L2.1@4185,3000 4258,3073 4623.82,3073 4841.82,2855 5547.56,2855 5609.06,2916.5 CN2.19@5609.06,2988
SCHT_TAP: C1.A6 CN1.21 CN2.21 | length 3986
  Top Layer w10: v2(2665,3575) 2670,3570 v2(2670,3421.07) ; C1.A6@3618.02,3590 3663.02,3635 v2(3820,3635) ; v2(3820,3635) 3830,3635 3820,3645 v2(3820,3635)
  Bottom Layer w10: CN1.21@2568.07,2988 2618,2988 2670,3040 v2(2670,3421.07) ; v2(2665,3575) 2683,3557 3585.02,3557 C1.A6@3618.02,3590 ; v2(3820,3635) 3802,3617 3802,3581.08 3851,3532.08 3851,3435.17 3873.67,3412.5 3891.39,3412.5 3907.5,3396.39 3907.5,3373.61 3879.13,3345.24 3879.13,3275.87 3893.48,3261.52 5135.07,3261.52 5153.08,3279.53 5198.89,3279.53 5235,3243.42 5235,3195 5175.98,3135.98 CN2.21@5175.98,2988
SENS_PWR: CN2.18 D13.1 F8.2 | length 2945.8
  Top Layer w20: CN2.18@5175.98,2751.78 5252.21,2828 5559.82,2828 5588.82,2857 5853.82,2857 6105,3108.18 6105,3625.62 6421.38,3942 6811.02,3942 F8.2@6860.12,3991.1 F8.2@6860.12,4228.9 6660.43,4228.9 D13.1@6655,4223.46
SHCT_IN_LATCH: CN2.20 L3.5 | length 2363.9
  Bottom Layer w20: L3.5@4185,3940 4155,3940 4080,3865 4080,3755 4240,3595 5055,3595 5150,3690 5215,3690 5455,3450 5455,3385 5332.21,3262.21 5332.21,3187.79 5392.52,3127.48 CN2.20@5392.52,2988
SHDN: R17.2 U7.5 | length 268.2
  Top Layer w10: R17.2@3827.56,1588 3798.65,1559.1 3798.65,1458.95 3810,1447.61 3810,1379.06 3812.45,1376.61 U7.5@3851.57,1376.61
SOLE_PWR: CN2.10 D26.1 F17.2 | length 1544.4
  Top Layer w100: CN2.10@5609.06,2358.08 5685.13,2282 5717.98,2282
  Top Layer w150: 5717.98,2282 6655,2282 6802.02,2282 F17.2@6860.12,2223.9 F17.2@6860.12,1986.1
Source: Q9.3 Q10.3
SWCLK: C1.A13 CN2.30 | length 1993.7
  Bottom Layer w10: C1.A13@3618.02,4290 3668.02,4240 3769.04,4240 3879.13,4129.91 3879.13,3924.75 4230.89,3573 5064.11,3573 5086.11,3595 5153.06,3595 CN2.30@5175.98,3617.92
SWDIO: C1.A12 CN2.27 | length 2015.9
  Bottom Layer w10: C1.A12@3618.02,4190 3663.02,4145 3815.96,4145 3845.13,4115.82 3845.13,3910.67 4216.8,3539 5091,3539 5175.98,3454.02 CN2.27@5175.98,3421.07
TRIG: C19.1 R42.1 U8.2 U8.6 | length 537.7
  Bottom Layer w10: U8.2@3585.2,1434.65 3670.24,1434.65 ; R42.1@3625.98,1257.2 3625.98,1287.95 3670.24,1332.2 ; C19.1@3727.72,1257.2 3727.72,1274.72 3670.24,1332.2 ; U8.6@3807.65,1484.65 3720.24,1484.65 3670.24,1434.65 ; 3670.24,1332.2 3670.24,1434.65
TS_ACTIVE: CN1.27 L1.5 | length 4523.5
  Top Layer w10: CN1.27@2563.04,2559.96 2574.07,2559.96 2607.11,2593 2677.11,2593 2730,2645.89 2730,2762.04 2787.96,2820 3095,2820 3137.79,2777.21 3137.79,2752.21 3183.29,2706.71 3849.63,2706.71 3916,2773.08 3916,2922.66 4002.56,3009.22 v2(4002.56,3032) ; v2(4695,2705) 4708.76,2691.24 5640.94,2691.24 5714.71,2765 v2(5770,2765)
  Bottom Layer w10: v2(4002.56,3032) 4016.89,3032 4107.39,2941.5 4488.5,2941.5 4679,2751 4679,2721 v2(4695,2705) ; v2(5770,2765) 5752,2783 5752,3162 5795,3205 5885,3205 L1.5@5955,3275
TS_CURR_SENS: CN1.26 L4.1 | length 4855.4
  Top Layer w10: CN1.26@2351.54,2554.93 2388.28,2554.93 2443.59,2610.24 2590.98,2610.24 2591.22,2610 2670.06,2610 2713,2652.94 2713,2769.08 2780.92,2837 3102.04,2837 3154.79,2784.25 3154.79,2759.25 3190.33,2723.71 3842.59,2723.71 3899,2780.12 3899,2929.7 3975.06,3005.76 3975.06,3043.39 4015.5,3083.83 4015.5,3590.5 4184.5,3759.5 4417.46,3759.5 4597.46,3939.5 4924.5,3939.5 v2(4940,3955) ; v2(5140,4420) 5155,4405 5460,4405 5590,4535 L4.1@5630,4535
  Bottom Layer w10: v2(4940,3955) 4950,3955 4963,3968 4963,4028 5120.68,4185.68 5120.68,4231.38 5140,4250.7 v2(5140,4420)
TSAL_PWR: CN2.14 D16.1 F12.2 | length 2867.9
  Top Layer w20: CN2.14@5392.52,2554.93 5487.25,2554.93 5558.18,2484 5737.37,2484 5766.37,2455 6554.15,2455 6570.81,2471.66 6679.76,2471.66 6680.1,2472 6767,2472 v2(6775,2480) ; v2(7005,2470) 7005,2467.56 7013,2459.56 7013,2412 7083.47,2341.53 7476.54,2341.53 7594.61,2223.46 D16.1@7630,2223.46 7630.43,2223.9 F12.2@7835.12,2223.9 F12.2@7835.12,1986.1
  Bottom Layer w20: v2(6775,2480) 6995,2480 v2(7005,2470)
UV_DELAY: Q8.1 R41.2 | length 177.7
  Top Layer w10: Q8.1@3632.4,1774.29 3632.4,1757.6 v6@3680,1710
  Bottom Layer w10: R41.2@3665.87,1622.2 3680,1636.34 v6@3680,1710
  other v6: 3690,1710
VBATT_RAW: D25.K pad.9@1495,1185.95 U2.1 U2.2 WM1.1 | length 1092.6
  Top Layer w200: WM1.1@1186.77,1803.15 WM1.1@1360,1803.15 ; WM1.1@1405,1805 1405,1390 1530,1265 1735,1265
  Bottom Layer w15: D25.K@1185,1925 1186.77,1923.23 WM1.1@1186.77,1803.15
VBATT_TO_PWR_SW: Q1.2 U2.3 U2.4 U5.7 | length 1580.5
  Top Layer w10: Q1.2@2140,1365.95 2210.95,1365.95 2260,1415 2260,1490.83 2329.17,1560 2433.72,1560 2531.94,1658.22 2710.06,1658.22 2713.28,1655 v2(2715,1655) ; v2@2941.81,1665 2935,1658.19 2935,1625 2962.5,1597.5 3058.79,1597.5 3077.72,1616.43 3145.22,1616.43 3164.7,1596.95 U5.7@3164.7,1558
  Top Layer w100: U2.4@1915,1259.76 U2.4@1924.99,1259.76 ; 2031.18,1365.95 Q1.2@2140,1365.95
  Top Layer w150: U2.4@1924.99,1259.76 2031.18,1365.95
  Bottom Layer w10: v2(2715,1655) 2925,1655 2935,1665 v2@2941.81,1665
  other v2: 2935,1670
VCU_PWR: CN2.25 D17.1 F13.2 | length 3800.8
  Top Layer w20: v2(7425,3835) 7425,3820 7526,3719 7526,2827.46 D17.1@7630,2723.46 ; D17.1@7635.43,2728.9 F13.2@7835.12,2728.9 F13.2@7835.12,2491.1
  Bottom Layer w20: CN2.25@5588.62,3441.51 CN2.25@5609.06,3421.07 5677.63,3352.5 6367.06,3352.5 6415.38,3304.18 6986,3304.18 7425,3743.18 v2(7425,3835)
VS: C14.2 C15.2 C17.2 C18.2 C19.2 CN2.2 F9.1 F10.1 F11.1 F12.1 F13.1 F14.1 F15.1 F16.1 F17.1 JMP1.3 LD1.1 LD1.12 LD1.25 LD2.7 LD2.12 LD2.13 pad.9@5495,1490 R7.2 R8.2 R40.1 U7.7 U8.4 U8.8 | length 9870.5
  Top Layer w10: U7.7@3851.57,1427.8 v2@3907.2,1427.8
  Top Layer w15: 4285,2100 C15.2@4397.44,2100
  Top Layer w20: R8.2@3252.56,1870 R7.2@3252.56,1795 3290,1757.56 v2(3290,1755) ; F9.1@7249.88,4728.9 F9.1@7249.88,4491.1 7420.98,4320 8090,4320 ; F10.1@7929.88,4728.9 F10.1@7929.88,4491.1 7929.88,4480.12 F10.1@7950,4460
  Top Layer w40: F10.1@7950,4460 8090,4320 8181.1,4228.9 F16.1@8224.88,4228.9
  Top Layer w150: F17.1@7249.88,2223.9 F17.1@7249.88,1986.1 7450,1785.98 v4(7450,1250)
  Top Layer w200: v4(7450,1250) 7845,1250 8224.88,1629.88 F11.1@8224.88,1728.9
  Bottom Layer w20: v2(3290,1755) 3350,1695 3405,1695 JMP1.3@3470,1630 3510,1590 3510,1554.29 3529.65,1534.65 ; U8.4@3585.2,1534.65 3529.65,1534.65 ; C19.2@3834.02,1257.2 3834.02,1229.02 3790,1185 3560,1185 3485,1260 3485,1490 3529.65,1534.65 ; v2(3910,1425) 3869.65,1384.65 U8.8@3807.65,1384.65 3807.65,1332.35 3830,1310 4180,1310 ; C18.2@4002.56,2530 4007.56,2525 v2(4085,2525) ; C17.2@4032.44,2160 4017.44,2145 4047.44,2115 v2(4056.22,2115)
  Bottom Layer w150: 4180,1365 4180,1310 4260,1230
  Bottom Layer w200: 4260,1230 5235.04,1230 5392.52,1387.48 5530,1250 v4(7450,1250) ; 5392.52,1397.52 5392.52,1645 CN2.2@5392.52,1767.53
  other v2: 4160,1325 4215,1325 4160,1385 4210,1385
VS_TO_LVPROT: D5.1 JMP2.2 JMP3.2 pad.9@3980,1175 Q2.2 Q3.2 Q9.2 R11.1 R13.2 R17.1 R18.1 U5.8 U7.1 | length 3655.9
  Top Layer w10: 3015,1265 3015,1384.71 3145.3,1515.01 U5.8@3145.3,1558 ; JMP2.2@3315,1400 3359.53,1444.53 3359.53,1470.47 ; JMP3.2@3315,1515 3359.53,1470.47 ; R13.2@3622.56,1449.01 3581.57,1490 ; R11.1@3622.56,1524.01 3588.55,1490 3581.57,1490 ; U7.1@3748.43,1453.39 3748.43,1450.67 3778.65,1450.67 ; D5.1@3766.54,1813 3740,1786.46 3740,1695.44 R18.1@3772.44,1663 3778.65,1656.79 3778.65,1450.67 ; 3790,1225 3790,1439.32 3778.65,1450.67 ; 3359.53,1470.47 3536.19,1470.47 3555.72,1490 3581.57,1490
  Top Layer w80: Q2.2@2365,1365.95 2474.05,1365.95 ; 2505,1335 2474.05,1365.95 ; Q3.2@2630,1465 2620,1475 2597.8,1475 2488.75,1365.95 2474.05,1365.95
  Top Layer w100: 3901.02,1225 Q9.2@4055,1378.98
  Top Layer w150: 2505,1335 2505,1270 2550,1225
  Top Layer w200: 2550,1225 3315,1225 3790,1225 3901.02,1225
  Bottom Layer w10: v2(3315,1300) JMP2.2@3315,1400
  Bottom Layer w50: Q3.2@2625.95,1460.95 Q3.2@2630,1465
VS_TO_MS: C16.1 CN2.3 pad.9@4755,1525 Q10.2 | length 1152.8
  Top Layer w50: C16.1@5078.46,1670 CN2.3@5175.98,1767.53
  Bottom Layer w80: Q10.2@4320,1383.92 4453.92,1383.92 4510,1440
  Bottom Layer w200: 4510,1440 4755,1440 4848.46,1440 CN2.3@5175.98,1767.53
pads on no net: CN1.16 CN1.19 CN1.20 CN1.29 CN1.31 CN1.32 CN1.34 CN1.35 CN1.36 CN1.37 CN1.38 LD1.11 LD2.2 U4.5 U4.7 U5.1 U5.5 U8.5 U8.7

## Polygon pours and split planes (outlines as drawn)
GND on Top Layer "GND_L01_P002" (solid, pour order 2): 1000,1100 8475,1100 8475,4870 1000,4870
GND on Bottom Layer "GND_L02_P003" (solid, pour order 3): 1000,1100 8475,1100 8475,4870 1000,4870

## Other copper
Top Layer:
  region net ACC_FAN_FUSE: 4520,2145 4520,2228.9 4345,2228.9 4345,2145
  region net VS: 4250,1747.6 4120,1747.6 4120,1290 4250,1290
  region net BUZR_FUSE: 4398,2436.98 4398,2502.48 4330,2502.48 4330,2436.98
  region net MC_EN_FUSE: 4398,2346.98 4398,2412.48 4330,2412.48 4330,2346.98
  region net MC_PWR_FUSE: 4398,2251.98 4398,2317.48 4330,2317.48 4330,2251.98
  region net ACC_FAN_FUSE: 4398,2156.98 4398,2222.48 4330,2222.48 4330,2156.98
  region net DCDC_PWR: 2785,1700 2785,1815 2510,1815 2510,1700
  region net VS: 4105,1805 4105,1685 4255,1685 4255,1805
  region net FANS_FUSE: 4520,1965 4520,2020 4235,2020 4235,1965
  region net PUMP_FUSE: 4365,1900 4365,1955 4235,1955 4235,1900
  region net DCDC_PWR: 2785,1702.6 2785,1797.6 2690,1797.6 2690,1702.6
  region net DCDC_TO_PWR_SW: 2890,1687.6 2890,1782.6 2800,1782.6 2800,1687.6
  region net VBATT_RAW: 1831.54,1220 1831.54,1315 1696.54,1315 1696.54,1220
  region net VBATT_TO_PWR_SW: 1980,1220 1980,1315 1845,1315 1845,1220
  region net VS: 8325,1417 8325,4290 8125,4290 8125,1417
  region net VS: 4095,2105 4135,2065 4135,1780 4255,1780 4315,1840 4315,1879.94 4315,1890 4225,1890 4225,2030 4315,2030 4315,2440 4280,2475 4190,2475 4120,2545 3955,2545 3955,2491.1 4045,2491.1 4045,2165 3960,2165 3960,2105
Bottom Layer:
  region net Source: 4370,1535 4370,1630 4005,1630 4005,1535
  region net NetQ3_3: 2935,1320 2935,1425 2585,1425 2585,1320
  region net NetQ1_3: 2430,1210 2430,1315 2080,1315 2080,1210

## Silkscreen, mask and mechanical layers (free items; w line width, h text height)
Top Overlay:
  drawing of 6 lines, arcs and shapes, not listed
  text "LATCH_DELAY" at 3605,4735 h60
  text "IMD" at 6545,4630 h60 r90
  text "ACU" at 7390,4300 h60
  text "SENS" at 6595,4020 h60 r90
  text "E_METER" at 7515,3855 h60 r90
  text "ACU" at 1145.72,3788.17 h60 r90
  text "AMS" at 7550,3535 h60 r90
  text "BUZR" at 6595,3500 h60 r90
  text "HVB" at 7545,3000 h60 r90
  text "MC_EN" at 6595,2960 h60 r90
  text "3V3" at 1085.72,2877.54 h60 r90
  text "ACC_FAN" at 4705,2585 h60
  text "3V3" at 1575.72,2567.54 h60 r90
  text "VCU" at 7535,2515 h60 r90
  text "5V" at 3410,2500 h60
  text "MC_PW" at 6580,2412 h60 r90
  text "TSAL" at 7560,2072.44 h60 r90
  text "RVRS" at 1575,2040 h60 r90
  text "FANS" at 6150,2035 h60
  text "SOLE" at 6570,2000 h60 r90
  text "DCDC" at 2425,1820 h60
  text "5V" at 3309.4,1815.87 h60
  text "UV/OV FAULT" at 3885,1775 h30
  text "DCDC / OVERRIDE" at 3280,1690 h30
  text "DIS" at 3125,1625 h30
  text "UV / DELAY" at 3630,1625 h30
  text "EN" at 3525,1620 h30
  text "BRAKE" at 7535,1540 h60 r90
  text "PUMP" at 6587.5,1525 h60 r90
  text "VS" at 5325,1449.5 h60
  text "VS / TO_MS" at 4555,1370 h60
  text "VBATT" at 1370,1250 h60
  text "LV PROT DISABLE" at 3102.5,1170 h30
  text "UV / OV" at 3375,1170 h30
  text "ePBR20_ACU_Power_rev0" at 6545,1156.86 h60
  text "VS_TO  LV_PROT" at 3635,1150 h60
Board Outline:
  the board outline again, w10

## Text inside footprints (layer, text, board x,y; h text height)
WM1: Top Overlay "1" at 1365,1515 h30 r270